# Altium PCB DRIVER.PcbDoc (part 5 of 5)
Units mm, origin at the board's own origin, x right, y up, seen from the top; angles counter-clockwise.
Board outline 130 x 51 mm, 4 copper layers (SIG, GND_SIG, PWR, GND_PWR), stack 1.544 mm thick; 199 components, 147 nets, 682 pads, 359 vias.
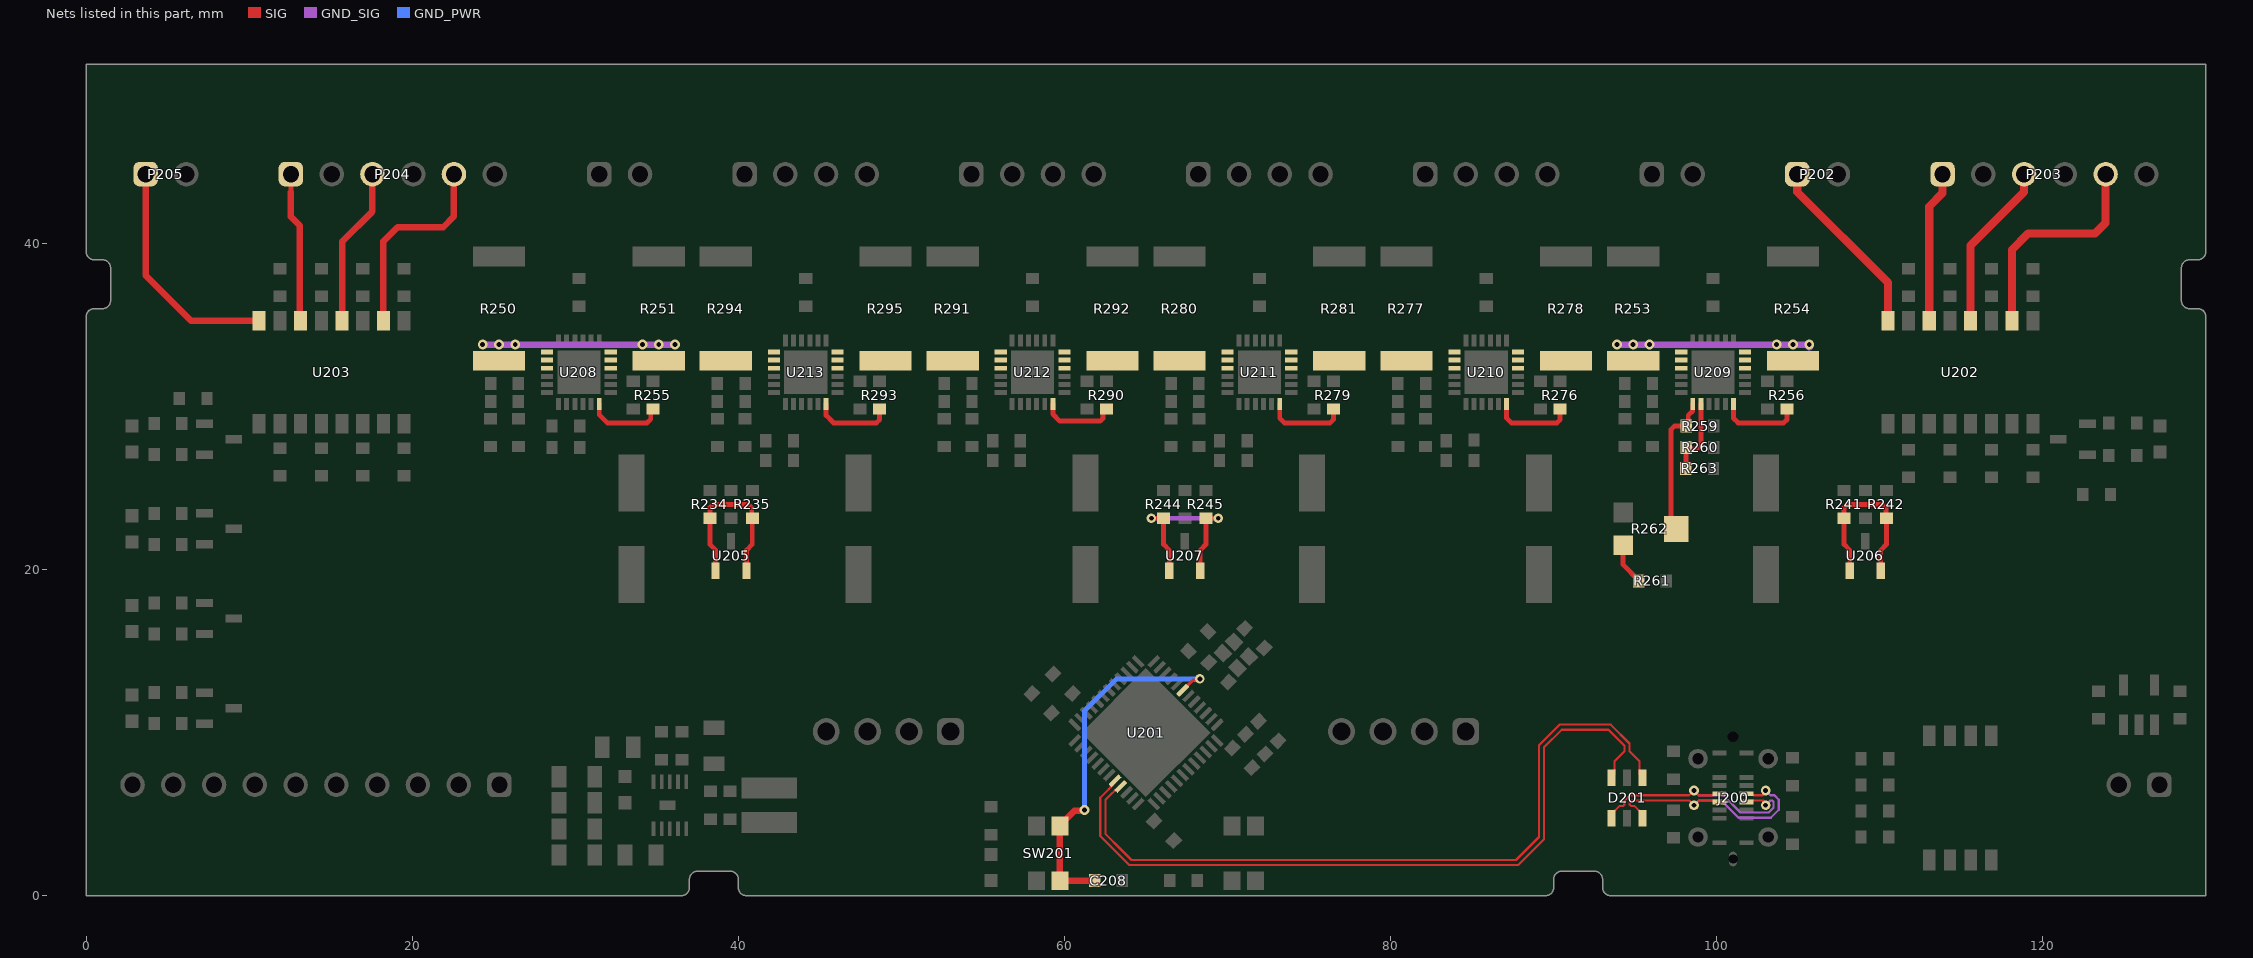
[diagram p5: the nets of this part, all layers, seen from the top]

## Via types
v1: diameter 0.6, hole 0.3, SIG to GND_PWR, tented both sides, 324 vias
v2: diameter 0.6, hole 0.3, SIG to GND_PWR, 35 vias

## Nets (pads, with @x,y where several pads share a name; then routed paths per layer and width w, separated by ;. In a path a pad name is that pad's centre, name@x,y a point inside that pad or via, vN(x,y) a via of type N, cw(c..) or ccw(c..) an arc to the next point about the centre after c; other vN are vias at no path point) (continued)
NetR234_1: R234.1 R235.1 U205.1 U205.2 | length 10.8
  SIG w0.3: U205.1@38.606,19.935 38.606,21.194 38.256,21.544 R234.1@38.256,23.15 38.256,23.8 38.456,24 40.6,24 40.826,23.774 40.826,23.18 R235.1@40.856,23.15 40.856,21.544 40.506,21.194 U205.2@40.506,19.935
NetR241_1: R241.1 R242.1 U206.1 U206.2 | length 10.8
  SIG w0.3: U206.1@108.161,19.935 108.161,21.194 107.811,21.544 R241.1@107.811,23.15 107.811,23.8 108.011,24 110.155,24 110.381,23.774 110.381,23.18 R242.1@110.411,23.15 110.411,21.544 110.061,21.194 U206.2@110.061,19.935
NetR244_1: R244.1 R245.1 U207.1 U207.2 | length 12.3
  SIG w0.3: v1(65.328,23.15) R244.1@66.078,23.15 66.078,21.544 66.428,21.194 U207.1@66.428,19.935 ; U207.2@68.328,19.935 68.328,21.194 68.678,21.544 R245.1@68.678,23.15 v1(69.428,23.15)
  GND_SIG w0.3: v1(65.328,23.15) v1(69.428,23.15)
NetR250_2: R250.2 R251.2 U208.4 U208.5 U208.6 U208.13 U208.14 U208.15 | length 11.8
  GND_SIG w0.4: v1(24.322,33.8) v1(36.122,33.8)
  other v1: 25.322,33.8 26.322,33.8 34.122,33.8 35.122,33.8
NetR253_2: R253.2 R254.2 U209.4 U209.5 U209.6 U209.13 U209.14 U209.15 | length 11.8
  GND_SIG w0.4: v1(93.877,33.8) v1(105.677,33.8)
  GND_SIG w0.5: v1@105.667,33.71 v1@105.677,33.7
  other v1: 94.877,33.8 95.877,33.8 103.677,33.8 104.677,33.8
NetR255_2: R255.2 U208.24 | length 4.8
  SIG w0.3: U208.24@31.472,30.15 31.472,29.491 31.963,29 34.4,29 34.626,29.226 34.626,29.72 R255.2@34.756,29.85
NetR256_2: R256.2 U209.24 | length 5
  SIG w0.3: U209.24@101.027,30.15 101.027,29.284 101.311,29 104.111,29 104.311,29.2 R256.2@104.311,29.85
NetR261_2: R261.2 R262.3 | length 2.6
  SIG w0.3: R262.3@94.256,21.5 94.256,20.3 95.206,19.35 R261.2@95.206,19.3
NetR276_2: R276.2 U210.24 | length 5
  SIG w0.3: U210.24@87.116,30.15 87.116,29.284 87.4,29 90.2,29 90.4,29.2 R276.2@90.4,29.85
NetR277_2: R277.2 U210.13 U210.14 U210.15
NetR278_2: R278.2 U210.4 U210.5 U210.6
NetR279_2: R279.2 U211.24 | length 5
  SIG w0.3: U211.24@73.205,30.15 73.205,29.284 73.489,29 76.289,29 76.489,29.2 R279.2@76.489,29.85
NetR280_2: R280.2 U211.13 U211.14 U211.15
NetR281_2: R281.2 U211.4 U211.5 U211.6
NetR290_2: R290.2 U212.24 | length 4.6
  SIG w0.3: U212.24@59.294,30.15 59.294,29.525 59.719,29.1 62.19,29.1 62.366,29.276 62.366,29.65 62.566,29.85 R290.2@62.578,29.85
NetR291_2: R291.2 U212.13 U212.14 U212.15
NetR292_2: R292.2 U212.4 U212.5 U212.6
NetR293_2: R293.2 U213.24 | length 4.9
  SIG w0.3: U213.24@45.383,30.15 45.383,29.455 45.838,29 48.467,29 48.667,29.2 R293.2@48.667,29.85
NetR294_2: R294.2 U213.13 U213.14 U213.15
NetR295_2: R295.2 U213.4 U213.5 U213.6
NRST: C208.2 SW201.2 SW201.4 U201.7 | length 22.7
  SIG w0.2: U201.7@67.249,12.602 67.258,12.602 67.879,13.223 68.223,13.223 v1(68.3,13.3)
  SIG w0.4: v1(61.225,5.25) 61.187,5.212 60.612,5.212 59.725,4.325 SW201.4@59.725,4.275 SW201.2@59.725,0.925 C208.2@61.85,0.925
  GND_PWR w0.3: v1(61.225,5.25) 61.225,11.325 63.2,13.3 v1(68.3,13.3)
OPT_DOOR: P202.1 U202.8 | length 11.3
  SIG w0.5: P202.1@104.938,44.25 104.938,43.15 110.493,37.595 U202.8@110.493,35.25
OPT_HOLD: P203.3 U202.4 | length 10.4
  SIG w0.5: U202.4@115.573,35.25 115.573,39.874 118.849,43.15 P203.3@118.849,44.25
OPT_LIM_X: P204.1 U203.6 | length 9.6
  SIG w0.3: 12.561,42.8 P204.1@12.561,44.25
  SIG w0.4: 12.561,43.15 12.561,42.8 12.561,41.639 13.1,41.1 13.1,35.307 U203.6@13.157,35.25
OPT_LIM_Y: P204.3 U203.4 | length 9.8
  SIG w0.4: U203.4@15.697,35.25 15.697,40.097 17.561,41.961 P204.3@17.561,44.25
OPT_LIM_Z: P204.5 U203.2 | length 12.4
  SIG w0.4: U203.2@18.237,35.25 18.237,40.137 19.1,41 21.9,41 22.561,41.661 P204.5@22.561,44.25
OPT_PROBE: P205.1 U203.8 | length 14.3
  SIG w0.4: P205.1@3.65,44.25 3.65,38.05 6.45,35.25 U203.8@10.617,35.25
OPT_SOFT_R: P203.5 U202.2 | length 13.8
  SIG w0.5: U202.2@118.113,35.25 118.113,39.613 119.1,40.6 123.2,40.6 123.849,41.249 P203.5@123.849,44.25
OPT_START: P203.1 U202.6 | length 9.3
  SIG w0.5: U202.6@113.033,35.25 113.033,42.266 113.849,43.082 P203.1@113.849,44.25
USBCON_N: D201.1 J200.A7 J200.B7 | length 15.8
  SIG w0.136: D201.1@93.55,4.755 93.55,5.009 94.05,5.509 94.264,5.509 94.343,5.588 94.343,5.831 94.672,6.159 97.982,6.159 97.984,6.157 98.307,6.157 v1(98.6,6.45) 98.893,6.157 99.733,6.157 99.744,6.168 100.088,6.168 J200.B7@100.17,6.25 ; J200.A7@101.83,5.75 101.912,5.832 102.256,5.832 102.267,5.843 102.593,5.843 102.835,5.843 102.949,5.729 102.949,5.601 v1(103,5.55)
  GND_SIG w0.136: v1(98.6,6.45) 98.893,6.157 100.402,6.157 101.462,5.097 103.188,5.097 103.487,5.396 103.487,5.764 103.408,5.843 103.293,5.843 v1(103,5.55)
USBCON_P: D201.3 J200.A6 J200.B6 | length 16.3
  SIG w0.136: D201.3@95.45,4.755 95.45,5.009 94.95,5.509 94.736,5.509 94.657,5.588 94.657,5.701 94.801,5.846 97.852,5.846 97.854,5.843 98.307,5.843 v1(98.6,5.55) 98.893,5.843 99.733,5.843 99.744,5.832 100.088,5.832 J200.B6@100.17,5.75 ; J200.A6@101.83,6.25 101.912,6.168 102.256,6.168 102.267,6.157 102.723,6.157 102.835,6.157 102.949,6.271 102.949,6.399 v1(103,6.45)
  GND_SIG w0.136: v1(98.6,5.55) 98.893,5.843 100.272,5.843 101.332,4.783 103.318,4.783 103.801,5.266 103.801,5.894 103.537,6.157 103.293,6.157 v1(103,6.45)
USBMIC_N: D201.6 U201.32 | length 46.1
  SIG w0.136: U201.32@63.105,7.044 63.105,6.949 62.855,6.699 62.855,6.663 62.719,6.527 62.195,6.003 62.195,3.662 63.178,2.678 63.978,1.878 87.822,1.878 89.413,3.47 89.413,9.1 90.492,10.178 93.365,10.178 94.343,9.2 94.343,8.86 93.736,8.253 93.736,7.431 D201.6@93.55,7.245
USBMIC_P: D201.4 U201.33 | length 45.8
  SIG w0.136: U201.33@63.459,6.691 63.363,6.691 63.114,6.441 63.077,6.441 62.849,6.213 62.509,5.873 62.509,3.791 63.492,2.808 64.108,2.192 87.692,2.192 89.1,3.6 89.1,9.23 90.362,10.492 93.495,10.492 94.657,9.33 94.657,8.86 95.264,8.253 95.264,7.431 D201.4@95.45,7.245
VAC_DIR: R260.2 R263.2 U209.20 | length 4.9
  SIG w0.3: R263.2@98.1,26.2 98.113,26.214 98.113,27.487 R260.2@98.127,27.5 98.227,27.4 98.8,27.4 99.027,27.627 U209.20@99.027,30.15
VAC_SPEED: R259.2 R262.2 U209.19 | length 8.8
  SIG w0.3: R262.2@97.505,22.5 97.2,22.805 97.2,28.6 97.4,28.8 R259.2@98.127,28.8 98.257,28.93 98.257,29.457 98.527,29.727 U209.19@98.527,30.15
pads on no net: J200.A8 J200.B8 J200.MH1 J200.MH2 U200.6 U201.2 U201.4 U201.16 U201.17 U201.21 U201.38 U201.39 U201.40 U201.41 U204.4

## Polygon pours and split planes (outlines as drawn)
NetP210_4 on SIG "NETP210_4_L01_P347" (solid, pour order 347): 86.966,34.425 87.424,34.425 87.599,34.6 87.599,36 87.799,36.2 88.499,36.2 88.699,36 88.699,33.9 88.477,33.678 86.966,33.678
NetP210_1 on SIG "NETP210_1_L01_P345" (solid, pour order 345): 84.766,34.425 84.308,34.425 84.133,34.6 84.133,36 83.933,36.2 83.233,36.2 83.033,36 83.033,33.9 83.255,33.678 84.766,33.678
NetP211_4 on SIG "NETP211_4_L01_P343" (solid, pour order 343): 73.055,34.425 73.513,34.425 73.688,34.6 73.688,36 73.888,36.2 74.588,36.2 74.788,36 74.788,33.9 74.566,33.678 73.055,33.678
NetP211_1 on SIG "NETP211_1_L01_P341" (solid, pour order 341): 70.855,34.425 70.397,34.425 70.222,34.6 70.222,36 70.022,36.2 69.322,36.2 69.122,36 69.122,33.9 69.344,33.678 70.855,33.678
NetP212_4 on SIG "NETP212_4_L01_P339" (solid, pour order 339): 59.144,34.425 59.602,34.425 59.777,34.6 59.777,36 59.977,36.2 60.677,36.2 60.877,36 60.877,33.9 60.655,33.678 59.144,33.678
NetP212_1 on SIG "NETP212_1_L01_P337" (solid, pour order 337): 56.944,34.425 56.486,34.425 56.311,34.6 56.311,36 56.111,36.2 55.411,36.2 55.211,36 55.211,33.9 55.433,33.678 56.944,33.678
NetP208_2 on SIG "NONET_L-01_P-001" (solid, pour order 352): 100.677,33.675 100.377,33.675 100.377,35.992 100.585,36.2 101.11,36.2 101.31,36 101.31,34.9 101.11,34.7 100.824,34.7 100.677,34.553
NetP208_1 on SIG "NETP208_1_L01_P351" (solid, pour order 351): 100.877,34.425 101.335,34.425 101.51,34.6 101.51,36 101.71,36.2 102.41,36.2 102.61,36 102.61,33.9 102.388,33.678 100.877,33.678
NetP208_2 on SIG "NONET_L-01_P-001" (solid, pour order 350): 98.877,33.675 99.177,33.675 99.177,35.992 98.969,36.2 98.444,36.2 98.244,36 98.244,34.9 98.444,34.7 98.73,34.7 98.877,34.553
NetP208_1 on SIG "NETP208_1_L01_P349" (solid, pour order 349): 98.677,34.425 98.219,34.425 98.044,34.6 98.044,36 97.844,36.2 97.144,36.2 96.944,36 96.944,33.9 97.166,33.678 98.677,33.678
NetP210_3 on SIG "NONET_L-01_P-001" (solid, pour order 348): 86.766,33.675 86.466,33.675 86.466,35.992 86.674,36.2 87.199,36.2 87.399,36 87.399,34.9 87.199,34.7 86.913,34.7 86.766,34.553
NetP210_2 on SIG "NONET_L-01_P-001" (solid, pour order 346): 84.966,33.675 85.266,33.675 85.266,35.992 85.058,36.2 84.533,36.2 84.333,36 84.333,34.9 84.533,34.7 84.819,34.7 84.966,34.553
NetP211_3 on SIG "NONET_L-01_P-001" (solid, pour order 344): 72.855,33.675 72.555,33.675 72.555,35.992 72.763,36.2 73.288,36.2 73.488,36 73.488,34.9 73.288,34.7 73.002,34.7 72.855,34.553
NetP211_2 on SIG "NONET_L-01_P-001" (solid, pour order 342): 71.055,33.675 71.355,33.675 71.355,35.992 71.147,36.2 70.622,36.2 70.422,36 70.422,34.9 70.622,34.7 70.908,34.7 71.055,34.553
NetP212_3 on SIG "NONET_L-01_P-001" (solid, pour order 340): 58.944,33.675 58.644,33.675 58.644,35.992 58.852,36.2 59.377,36.2 59.577,36 59.577,34.9 59.377,34.7 59.091,34.7 58.944,34.553
NetP212_2 on SIG "NONET_L-01_P-001" (solid, pour order 338): 57.144,33.675 57.444,33.675 57.444,35.992 57.236,36.2 56.711,36.2 56.511,36 56.511,34.9 56.711,34.7 56.997,34.7 57.144,34.553
NetP207_2 on SIG "NONET_L-01_P-001" (solid, pour order 336): 31.122,33.675 30.822,33.675 30.822,35.992 31.03,36.2 31.555,36.2 31.755,36 31.755,34.9 31.555,34.7 31.269,34.7 31.122,34.553
NetP207_1 on SIG "NETP207_1_L01_P335" (solid, pour order 335): 31.322,34.425 31.78,34.425 31.955,34.6 31.955,36 32.155,36.2 32.855,36.2 33.055,36 33.055,33.9 32.833,33.678 31.322,33.678
NetP207_2 on SIG "NONET_L-01_P-001" (solid, pour order 334): 29.322,33.675 29.622,33.675 29.622,35.992 29.414,36.2 28.889,36.2 28.689,36 28.689,34.9 28.889,34.7 29.175,34.7 29.322,34.553
NetP207_1 on SIG "NETP207_1_L01_P333" (solid, pour order 333): 29.122,34.425 28.664,34.425 28.489,34.6 28.489,36 28.289,36.2 27.589,36.2 27.389,36 27.389,33.9 27.611,33.678 29.122,33.678
+24V_PSU on SIG "NONET_L-01_P-001" (solid, pour order 328): 32.3,23.8 32.6,23.5 34.3,23.5 34.6,23.8 34.6,28.289 34.289,28.6 32.589,28.6 32.3,28.311
+24V_PSU on SIG "NONET_L-01_P-001" (solid, pour order 332): 101.855,23.8 102.155,23.5 103.855,23.5 104.155,23.8 104.155,28.289 103.844,28.6 102.144,28.6 101.855,28.311
+24V_PSU on SIG "NONET_L-01_P-001" (solid, pour order 331): 87.944,23.8 88.244,23.5 89.944,23.5 90.244,23.8 90.244,28.289 89.933,28.6 88.233,28.6 87.944,28.311
+24V_PSU on SIG "NONET_L-01_P-001" (solid, pour order 330): 74.033,23.8 74.333,23.5 76.033,23.5 76.333,23.8 76.333,28.289 76.022,28.6 74.322,28.6 74.033,28.311
+24V_PSU on SIG "NONET_L-01_P-001" (solid, pour order 329): 60.122,23.8 60.422,23.5 62.122,23.5 62.422,23.8 62.422,28.289 62.111,28.6 60.411,28.6 60.122,28.311
NetP213_4 on SIG "NETP213_4_L01_P316" (solid, pour order 316): 45.233,34.425 45.691,34.425 45.866,34.6 45.866,36 46.066,36.2 46.766,36.2 46.966,36 46.966,33.9 46.744,33.678 45.233,33.678
NetP213_3 on SIG "NONET_L-01_P-001" (solid, pour order 317): 45.033,33.675 44.733,33.675 44.733,35.992 44.941,36.2 45.466,36.2 45.666,36 45.666,34.9 45.466,34.7 45.18,34.7 45.033,34.553
NetP213_2 on SIG "NONET_L-01_P-001" (solid, pour order 278): 43.233,33.675 43.533,33.675 43.533,35.992 43.325,36.2 42.8,36.2 42.6,36 42.6,34.9 42.8,34.7 43.086,34.7 43.233,34.553
NetP213_1 on SIG "NETP213_1_L01_P277" (solid, pour order 277): 43.033,34.425 42.575,34.425 42.4,34.6 42.4,36 42.2,36.2 41.5,36.2 41.3,36 41.3,33.9 41.522,33.678 43.033,33.678
GND on SIG "NONET_L-01_P-001" (solid, pour order 310): 101.855,18.2 102.155,17.9 103.855,17.9 104.155,18.2 104.155,21.8 103.855,22.1 102.155,22.1 101.855,21.8
GND on SIG "NONET_L-01_P-001" (solid, pour order 308): 87.944,18.2 88.244,17.9 89.944,17.9 90.244,18.2 90.244,21.8 89.944,22.1 88.244,22.1 87.944,21.8
GND on SIG "NONET_L-01_P-001" (solid, pour order 306): 74.033,18.2 74.333,17.9 76.033,17.9 76.333,18.2 76.333,21.8 76.033,22.1 74.333,22.1 74.033,21.8
GND on SIG "NONET_L-01_P-001" (solid, pour order 304): 60.122,18.2 60.422,17.9 62.122,17.9 62.422,18.2 62.422,21.8 62.122,22.1 60.422,22.1 60.122,21.8
+24V_PSU on SIG "NONET_L-01_P-001" (solid, pour order 303): 46.211,23.8 46.511,23.5 48.211,23.5 48.511,23.8 48.511,28.289 48.2,28.6 46.5,28.6 46.211,28.311
GND on SIG "NONET_L-01_P-001" (solid, pour order 302): 46.211,18.2 46.511,17.9 48.211,17.9 48.511,18.2 48.511,21.8 48.211,22.1 46.511,22.1 46.211,21.8
+24V_PSU on SIG "+24V_PSU_L01_P296" (solid, pour order 296): 99.377,33.675 100.177,33.675 100.177,36.5 99.377,36.5
+24V_PSU on SIG "+24V_PSU_L01_P291" (solid, pour order 291): 85.466,33.675 86.266,33.675 86.266,36.5 85.466,36.5
+24V_PSU on SIG "+24V_PSU_L01_P286" (solid, pour order 286): 71.555,33.675 72.355,33.675 72.355,36.5 71.555,36.5
+24V_PSU on SIG "+24V_PSU_L01_P281" (solid, pour order 281): 57.644,33.675 58.444,33.675 58.444,36.5 57.644,36.5
+24V_PSU on SIG "+24V_PSU_L01_P276" (solid, pour order 276): 43.733,33.675 44.533,33.675 44.533,36.5 43.733,36.5
+VDD_MCU on SIG "NONET_L-01_P-001" (solid, pour order 240): 37.7,11 37.7,9.9 37.9,9.7 39.2,9.7 40.7,8.2 43.4,8.2 43.6,8.4 43.6,11 43.4,11.2 37.9,11.2
NetR253_2 on SIG "NONET_L-01_P-001" (solid, pour order 249): 96.477,32.801 93.06,32.801 93.011,32.85 93.011,34.1 93.211,34.3 96.341,34.3 96.536,34.104 96.536,33.786 97.022,33.3 97.022,32.8
NetR253_2 on SIG "NONET_L-01_P-001" (solid, pour order 248): 103.077,32.801 106.494,32.801 106.543,32.85 106.543,34.1 106.343,34.3 103.213,34.3 103.018,34.104 103.018,33.786 102.532,33.3 102.532,32.8
NetR250_2 on SIG "NONET_L-01_P-001" (solid, pour order 247): 33.522,32.801 36.939,32.801 36.988,32.85 36.988,34.1 36.788,34.3 33.658,34.3 33.463,34.104 33.463,33.786 32.977,33.3 32.977,32.8
NetR250_2 on SIG "NONET_L-01_P-001" (solid, pour order 246): 26.922,32.801 23.505,32.801 23.456,32.85 23.456,34.1 23.656,34.3 26.786,34.3 26.981,34.104 26.981,33.786 27.467,33.3 27.467,32.8
GND on SIG "NONET_L-01_P-001" (solid, pour order 233): 32.3,6.1 32.3,4.1 32.6,3.8 32.6,1.8 33.5,1.8 33.5,3.8 33.8,4.1 33.8,6.1
GND on SIG "NONET_L-01_P-001" (solid, pour order 237): 31.1,8.5 31.3,8.3 32,8.3 32.2,8.5 32.2,9.7 32.5,10 34.5,10 34.8,9.7 37,9.7 37.2,9.9 37.2,10.6 37,10.8 31.3,10.8 31.1,10.6
+3V3 on SIG "NONET_L-01_P-001" (solid, pour order 236): 36.15,8.7 36.145,8.695 36.145,6.555 36.652,6.048 39.852,6.048 40.1,5.8 43.6,5.8 43.6,7.5 40.2,7.5 39,8.7
+24V_PSU on SIG "NONET_L-01_P-001" (solid, pour order 232): 29.5,2 30.1,1.4 34.2,1.4 34.5,1.7 34.5,3.2 34.7,3.4 35,3.4 35.186,3.586 35.186,4.6 35.914,4.6 35.914,1.014 35.4,0.5 26.9,0.5 26.9,2
NetL200_1 on SIG "NONET_L-01_P-001" (solid, pour order 234): 36.186,4.6 36.186,2.814 36.9,2.1 43.1,2.1 43.6,2.6 43.6,5.148 40.2,5.148 40.2,3.4 39.8,3 36.8,3 36.414,3.386 36.414,4.6
GND on SIG "NONET_L-01_P-001" (solid, pour order 235): 35.155,5.243 36.357,5.243 36.686,4.914 36.686,3.514 36.9,3.3 39.7,3.3 39.9,3.5 39.9,5.1 39.7,5.3 37.467,5.3 36.914,5.853 35.155,5.853
+24V_PSU on SIG "NONET_L-01_P-001" (solid, pour order 231): 14.3,7.5 14.8,8 26,8 29.5,8 29.8,7.7 29.8,1 29.3,0.5 14.8,0.5 14.3,1
+VREF_STPR on SIG "+VREF_STPR_L01_P222" (solid, pour order 222): 59.619,31 60.378,31 60.478,30.9 60.478,30.611 60.589,30.5 61.789,30.5 61.878,30.411 61.878,29.6 61.778,29.5 59.778,29.5 59.619,29.659 59.619,30.997
+VREF_STPR on SIG "+VREF_STPR_L01_P225" (solid, pour order 225): 45.708,31 46.467,31 46.567,30.9 46.567,30.611 46.678,30.5 47.878,30.5 47.967,30.411 47.967,29.6 47.867,29.5 45.867,29.5 45.708,29.659 45.708,30.997
+VREF_SP on SIG "+VREF_SP_L01_P226" (solid, pour order 226): 31.797,31.5 32.545,31.5 32.656,31.389 32.656,30.7 32.856,30.5 33.945,30.5 34.056,30.389 34.056,29.6 33.956,29.5 31.956,29.5 31.797,29.659 31.797,30.997
+VREF_VAC on SIG "+VREF_VAC_L01_P127" (solid, pour order 127): 101.352,31.5 102.1,31.5 102.211,31.389 102.211,30.7 102.411,30.5 103.5,30.5 103.611,30.389 103.611,29.6 103.511,29.5 101.511,29.5 101.352,29.659 101.352,30.997
+VREF_STPR on SIG "+VREF_STPR_L01_P223" (solid, pour order 223): 87.441,31 88.2,31 88.3,30.9 88.3,30.611 88.411,30.5 89.611,30.5 89.7,30.411 89.7,29.6 89.6,29.5 87.6,29.5 87.441,29.659 87.441,30.997
+VREF_STPR on SIG "+VREF_STPR_L01_P074" (solid, pour order 74): 73.53,31 74.289,31 74.389,30.9 74.389,30.611 74.5,30.5 75.7,30.5 75.789,30.411 75.789,29.6 75.689,29.5 73.689,29.5 73.53,29.659 73.53,30.997
GND on SIG "GND_L01_P019" (solid, pour order 19): 81.7,28.4 81.7,26.3 81.8,26.2 83.7,26.2 83.8,26.3 83.8,28.4 83.7,28.5 81.8,28.5
GND on SIG "GND_L01_P075" (solid, pour order 75): 67.789,28.4 67.789,26.3 67.889,26.2 69.789,26.2 69.889,26.3 69.889,28.4 69.789,28.5 67.889,28.5
GND on SIG "GND_L01_P087" (solid, pour order 87): 53.878,28.4 53.878,26.3 53.978,26.2 55.878,26.2 55.978,26.3 55.978,28.4 55.878,28.5 53.978,28.5
GND on SIG "GND_L01_P099" (solid, pour order 99): 39.967,28.4 39.967,26.3 40.067,26.2 41.967,26.2 42.067,26.3 42.067,28.4 41.967,28.5 40.067,28.5
GND on SIG "GND_L01_P129" (solid, pour order 129): 17 vertices, not listed, extent 93.011,37.3 106.511,41.8
GND on SIG "NONET_L-01_P-001" (solid, pour order 174): 32.3,18.2 32.6,17.9 34.3,17.9 34.6,18.2 34.6,21.8 34.3,22.1 32.6,22.1 32.3,21.8
GND on SIG "NONET_L-01_P-001" (solid, pour order 155): 30.845,31.7 32.945,31.7 33.045,31.6 33.045,31.2 33.145,31.1 35.245,31.1 35.345,31.2 35.345,31.9 35.245,32 30.845,32
GND on SIG "NONET_L-01_P-001" (solid, pour order 154): 29.822,31.1 29.822,29.623 29.922,29.523 29.922,27.023 30.045,26.9 30.445,26.9 30.622,27.077 30.622,29.523 30.622,31.1
NetR250_2 on SIG "NETR250_2_L01_P151" (solid, pour order 151): 31.763,33.5 36.838,33.5 36.963,33.375 36.963,32.325 36.838,32.2 33.463,32.2 31.763,32.2
NetR250_2 on SIG "NETR250_2_L01_P150" (solid, pour order 150): 28.681,32.2 23.656,32.2 23.456,32.4 23.456,33.3 23.656,33.5 26.981,33.5 28.681,33.5
+24V_PSU on SIG "+24V_PSU_L01_P145" (solid, pour order 145): 29.822,33.675 30.622,33.675 30.622,36.5 29.822,36.5
+24V_PSU on SIG "+24V_PSU_L01_P144" (solid, pour order 144): 29.822,33.675 30.622,33.675 30.622,36.5 29.822,36.5
GND on SIG "GND_L01_P143" (solid, pour order 143): 17 vertices, not listed, extent 23.456,37.3 36.956,41.8
GND on SIG "NONET_L-01_P-001" (solid, pour order 128): 99.377,31.1 99.377,29.623 99.477,29.523 99.477,27.023 99.6,26.9 100,26.9 100.177,27.077 100.177,29.523 100.177,31.1
GND on SIG "NONET_L-01_P-001" (solid, pour order 126): 100.4,31.7 102.5,31.7 102.6,31.6 102.6,31.2 102.7,31.1 104.8,31.1 104.9,31.2 104.9,31.9 104.8,32 100.4,32
NetR253_2 on SIG "NETR253_2_L01_P122" (solid, pour order 122): 98.236,32.2 93.211,32.2 93.011,32.4 93.011,33.3 93.211,33.5 96.536,33.5 98.236,33.5
NetR253_2 on SIG "NETR253_2_L01_P121" (solid, pour order 121): 101.318,33.5 106.393,33.5 106.518,33.375 106.518,32.325 106.393,32.2 103.018,32.2 101.318,32.2
GND on SIG "NONET_L-01_P-001" (solid, pour order 120): 44.978,32 49.178,32 49.278,31.9 49.278,31.3 49.178,31.2 44.978,31.2
GND on SIG "NONET_L-01_P-001" (solid, pour order 119): 58.889,32 63.089,32 63.189,31.9 63.189,31.3 63.089,31.2 58.889,31.2
GND on SIG "NONET_L-01_P-001" (solid, pour order 118): 86.711,32 90.911,32 91.011,31.9 91.011,31.3 90.911,31.2 86.711,31.2
GND on SIG "NONET_L-01_P-001" (solid, pour order 117): 72.8,32 77,32 77.1,31.9 77.1,31.3 77,31.2 72.8,31.2
GND on SIG "GND_L01_P092" (solid, pour order 92): 17 vertices, not listed, extent 37.367,37.3 50.867,41.8
NetR295_2 on SIG "NETR295_2_L01_P091" (solid, pour order 91): 45.674,33.5 50.749,33.5 50.874,33.375 50.874,32.325 50.749,32.2 47.374,32.2 45.674,32.2
NetR294_2 on SIG "NETR294_2_L01_P090" (solid, pour order 90): 42.592,32.2 37.567,32.2 37.367,32.4 37.367,33.3 37.567,33.5 40.892,33.5 42.592,33.5
GND on SIG "GND_L01_P080" (solid, pour order 80): 17 vertices, not listed, extent 51.278,37.3 64.778,41.8
NetR292_2 on SIG "NETR292_2_L01_P079" (solid, pour order 79): 59.585,33.5 64.66,33.5 64.785,33.375 64.785,32.325 64.66,32.2 61.285,32.2 59.585,32.2
NetR291_2 on SIG "NETR291_2_L01_P078" (solid, pour order 78): 56.503,32.2 51.478,32.2 51.278,32.4 51.278,33.3 51.478,33.5 54.803,33.5 56.503,33.5
GND on SIG "GND_L01_P068" (solid, pour order 68): 17 vertices, not listed, extent 65.189,37.3 78.689,41.8
NetR281_2 on SIG "NETR281_2_L01_P067" (solid, pour order 67): 73.496,33.5 78.571,33.5 78.696,33.375 78.696,32.325 78.571,32.2 75.196,32.2 73.496,32.2
NetR280_2 on SIG "NETR280_2_L01_P066" (solid, pour order 66): 70.414,32.2 65.389,32.2 65.189,32.4 65.189,33.3 65.389,33.5 68.714,33.5 70.414,33.5
GND on SIG "GND_L01_P002" (solid, pour order 2): 17 vertices, not listed, extent 79.1,37.3 92.6,41.8
NetR278_2 on SIG "NETR278_2_L01_P001" (solid, pour order 1): 87.407,33.5 92.482,33.5 92.607,33.375 92.607,32.325 92.482,32.2 89.107,32.2 87.407,32.2
NetR277_2 on SIG "NETR277_2_L01_P000" (solid, pour order 0): 84.325,32.2 79.3,32.2 79.1,32.4 79.1,33.3 79.3,33.5 82.625,33.5 84.325,33.5
+VDD_MCU on PWR "PWR-+VDD_MCU" (solid, pour order 383): 35 vertices, not listed, extent 38.5,0.5 106,16.5
+3V3 on PWR "PWR-+3V3" (solid, pour order 381): 42 vertices, not listed, extent 0.5,0.5 122.5,29.5
+24V_PSU on PWR "NONET_L-01_P-001" (solid, pour order 375): 25 vertices, not listed, extent 99.244,26.3 104.444,36.1
+24V_PSU on PWR "NONET_L-01_P-001" (solid, pour order 376): 25 vertices, not listed, extent 29.689,26.3 34.889,36.1
+24V_PSU on PWR "NONET_L-01_P-001" (solid, pour order 314): 18 vertices, not listed, extent 14.5,5 106,28
NetP207_1 on PWR "NONET_L-01_P-001" (solid, pour order 185): 17 vertices, not listed, extent 27.2,34.1 32.3,45.2
NetP213_4 on PWR "NETP213_4_L03_P324" (solid, pour order 324): 46.266,36.2 46.066,36 46.066,35 46.266,34.8 48.466,34.8 48.666,35 48.666,44.9 48.366,45.2 47.366,45.2 47.091,44.925 47.091,36.325 46.966,36.2
NetP212_4 on PWR "NETP212_4_L03_P355" (solid, pour order 355): 60.177,36.2 59.977,36 59.977,35 60.177,34.8 62.377,34.8 62.577,35 62.577,44.9 62.277,45.2 61.277,45.2 61.002,44.925 61.002,36.325 60.877,36.2
NetP212_1 on PWR "NETP212_1_L03_P353" (solid, pour order 353): 55.911,36.2 56.111,36 56.111,35 55.911,34.8 53.711,34.8 53.511,35 53.511,44.9 53.811,45.2 54.811,45.2 55.086,44.925 55.086,36.325 55.211,36.2
NetP211_4 on PWR "NETP211_4_L03_P360" (solid, pour order 360): 74.088,36.2 73.888,36 73.888,35 74.088,34.8 76.288,34.8 76.488,35 76.488,44.9 76.188,45.2 75.188,45.2 74.913,44.925 74.913,36.325 74.788,36.2
NetP211_1 on PWR "NETP211_1_L03_P358" (solid, pour order 358): 69.822,36.2 70.022,36 70.022,35 69.822,34.8 67.622,34.8 67.422,35 67.422,44.9 67.722,45.2 68.722,45.2 68.997,44.925 68.997,36.325 69.122,36.2
NetP210_4 on PWR "NETP210_4_L03_P365" (solid, pour order 365): 87.999,36.2 87.799,36 87.799,35 87.999,34.8 90.199,34.8 90.399,35 90.399,44.9 90.099,45.2 89.099,45.2 88.824,44.925 88.824,36.325 88.699,36.2
NetP210_1 on PWR "NETP210_1_L03_P363" (solid, pour order 363): 83.733,36.2 83.933,36 83.933,35 83.733,34.8 81.533,34.8 81.333,35 81.333,44.9 81.633,45.2 82.633,45.2 82.908,44.925 82.908,36.325 83.033,36.2
NetP208_1 on PWR "NETP208_1_L03_P373" (solid, pour order 373): 97.644,36.2 97.844,36 97.844,35 97.644,34.8 95.444,34.8 95.244,35 95.244,44.9 95.544,45.2 96.544,45.2 96.819,44.925 96.819,36.325 96.944,36.2
+24V_PSU on PWR "NONET_L-01_P-001" (solid, pour order 367): 25 vertices, not listed, extent 85.333,26.3 90.533,36.1
+24V_PSU on PWR "NONET_L-01_P-001" (solid, pour order 362): 25 vertices, not listed, extent 71.422,26.3 76.622,36.1
+24V_PSU on PWR "NONET_L-01_P-001" (solid, pour order 357): 25 vertices, not listed, extent 57.511,26.3 62.711,36.1
NetP207_2 on PWR "NONET_L-01_P-001" (solid, pour order 163): 17 vertices, not listed, extent 28.5,34.1 34.8,45.2
NetP208_2 on PWR "NETP208_2_L03_P374" (solid, pour order 374): 98.244,34.8 98.044,35 98.044,36.1 97.743,36.401 97.743,44.899 98.044,45.2 99.044,45.2 99.294,44.95 99.294,36.251 99.044,36.001 99.044,35 98.844,34.8
NetP210_3 on PWR "NETP210_3_L03_P366" (solid, pour order 366): 87.399,34.8 87.599,35 87.599,36.1 87.9,36.401 87.9,44.899 87.599,45.2 86.599,45.2 86.349,44.95 86.349,36.251 86.599,36.001 86.599,35 86.799,34.8
NetP210_2 on PWR "NETP210_2_L03_P364" (solid, pour order 364): 84.333,34.8 84.133,35 84.133,36.1 83.832,36.401 83.832,44.899 84.133,45.2 85.133,45.2 85.383,44.95 85.383,36.251 85.133,36.001 85.133,35 84.933,34.8
NetP211_3 on PWR "NETP211_3_L03_P361" (solid, pour order 361): 73.488,34.8 73.688,35 73.688,36.1 73.989,36.401 73.989,44.899 73.688,45.2 72.688,45.2 72.438,44.95 72.438,36.251 72.688,36.001 72.688,35 72.888,34.8
NetP211_2 on PWR "NETP211_2_L03_P359" (solid, pour order 359): 70.422,34.8 70.222,35 70.222,36.1 69.921,36.401 69.921,44.899 70.222,45.2 71.222,45.2 71.472,44.95 71.472,36.251 71.222,36.001 71.222,35 71.022,34.8
NetP212_3 on PWR "NETP212_3_L03_P356" (solid, pour order 356): 59.577,34.8 59.777,35 59.777,36.1 60.078,36.401 60.078,44.899 59.777,45.2 58.777,45.2 58.527,44.95 58.527,36.251 58.777,36.001 58.777,35 58.977,34.8
NetP212_2 on PWR "NETP212_2_L03_P354" (solid, pour order 354): 56.511,34.8 56.311,35 56.311,36.1 56.01,36.401 56.01,44.899 56.311,45.2 57.311,45.2 57.561,44.95 57.561,36.251 57.311,36.001 57.311,35 57.111,34.8
+24V_PSU on PWR "NONET_L-01_P-001" (solid, pour order 327): 25 vertices, not listed, extent 43.6,26.3 48.8,36.1
NetP213_3 on PWR "NETP213_3_L03_P325" (solid, pour order 325): 45.666,34.8 45.866,35 45.866,36.1 46.167,36.401 46.167,44.899 45.866,45.2 44.866,45.2 44.616,44.95 44.616,36.251 44.866,36.001 44.866,35 45.066,34.8
NetP213_2 on PWR "NETP213_2_L03_P161" (solid, pour order 161): 42.6,34.8 42.4,35 42.4,36.1 42.099,36.401 42.099,44.899 42.4,45.2 43.4,45.2 43.65,44.95 43.65,36.251 43.4,36.001 43.4,35 43.2,34.8
NetP213_1 on PWR "NETP213_1_L03_P116" (solid, pour order 116): 42,36.2 42.2,36 42.2,35 42,34.8 39.8,34.8 39.6,35 39.6,44.9 39.9,45.2 40.9,45.2 41.175,44.925 41.175,36.325 41.3,36.2
+VBUS on PWR "NONET_L-01_P-001" (solid, pour order 267): 105.5,0.5 106,1 106,10 105.5,10.5 94.5,10.5 94,10 94,6.5 94.5,6 97,6 97.5,5.5 97.5,1 98,0.5
+3V3_ISO on PWR "NONET_L-01_P-001" (solid, pour order 215): 29 vertices, not listed, extent 11,12.2 129.5,50.5
GND_ISO on GND_SIG "NONET_L-01_P-001" (solid, pour order 197): 29 vertices, not listed, extent 0.5,0.5 129.5,50.5
GND on GND_SIG "GND_SIG-GND" (solid, pour order 384): 35 vertices, not listed, extent 0.5,0.5 121,31.5
GND on GND_PWR "GND_PWR-GND" (solid, pour order 380): 48 vertices, not listed, extent 0.5,0.5 129.5,43

## Silkscreen, mask and mechanical layers (free items; w line width, h text height)
Top Overlay:
  text "PROBE" at 3.195,40.785 h1.4
  text "FIM DE CURSO" at 14.964,40.785 h1.4
  text "SPINDLE" at 30.59,40.785 h1.4
  text "EIXO Z" at 42.406,40.785 h1.4
  text "EIXO Y2" at 55.935,40.785 h1.4
  text "EIXO Y1" at 69.932,40.785 h1.4
  text "EIXO X" at 84.035,40.785 h1.4
  text "ASPIRADOR" at 94.111,40.785 h1.4
  text "PORTA" at 104.437,40.785 h1.4
  text "CONTROLES" at 117.278,40.785 h1.4
  text "PROBE" at 1.44,26.295 h1.4 r90
  text "PORTA" at 129.389,26.249 h1.4 r90
  text "LIM X" at 1.44,21.071 h1.4 r90
  text "LIM Y" at 1.44,15.611 h1.4 r90
  text "GND" at 45.605,11.8 h1.4 r90
  text "TX" at 48.145,11.8 h1.4 r90
  text "RX" at 50.685,11.8 h1.4 r90
  text "VDD" at 53.225,11.8 h1.4 r90
  text "GND" at 77.605,11.8 h1.4 r90
  text "SWCLK" at 80.145,11.8 h1.4 r90
  text "SWDIO" at 82.685,11.8 h1.4 r90
  text "VDD" at 85.225,11.8 h1.4 r90
  text "AUG/2026 - REV: 0.1" at 14.452,11.551 h1.4 r90
  text "LIM Z" at 1.44,10.175 h1.4 r90
  text "NRST" at 57.75,5.485 h1.4
  text "BOOT" at 69.506,5.485 h1.4
Bottom Solder:
  rectangle: 30,19.5 100,40.5
Board Outline:
  lines w0.2: 0,0 36.5,0 ccw(c36.5,0.5) 37,0.5 37,1 cw(c37.5,1) 37.5,1.5 39,1.5 39.5,1.5 cw(c39.5,1) 40,1 40,0.5 ccw(c40.5,0.5) 40.5,0 89.5,0 ccw(c89.5,0.5) 90,0.5 90,1 cw(c90.5,1) 90.5,1.5 92,1.5 92.5,1.5 cw(c92.5,1) 93,1 93,0.5 ccw(c93.5,0.5) 93.5,0 130,0 130,5 130,32 130,35.5 ccw(c129.5,35.5) 129.5,36 129,36 cw(c129,36.5) 128.5,36.5 128.5,38 128.5,38.5 cw(c129,38.5) 129,39 129.5,39 ccw(c129.5,39.5) 130,39.5 130,50 0,50 0,39.5 ccw(c0.5,39.5) 0.5,39 1,39 cw(c1,38.5) 1.5,38.5 1.5,37 1.5,36.5 cw(c1,36.5) 1,36 0.5,36 ccw(c0.5,35.5) 0,35.5 0,32 0,5 0,0
Info:
  drawing of 295 lines, arcs and shapes, not listed
  text "PCB Technical Specification /  / - Base Material: FR-4 / - Number of Layers: 4 / - Board Dimensions: 130 x 51 mm / - Surface Finish: HASL (With Lead) / - Outer Copper Weight: 1oz / - Inner Copper Weight: 1oz / - Specify Stackup: Yes, JLC041611-3313 / - Impedance Control: Yes / - Via Covering: Plugged (or tented, whatever is cheaper) / - Min via hole size/diameter: 0.3mm/0.6mm / - Solder Mask: Top and Bottom (Green) / - Silkscreen: Top only (White)" at 135,39.848 h2
  text "Layer" at 136.968,36.83 h1.52
  text "Name" at 147.38,36.83 h1.52
  text "Material" at 170.996,36.83 h1.52
  text "Thickness" at 192.834,36.83 h1.52
  text "Constant" at 209.34,36.83 h1.52
  text "Board Layer Stack" at 223.814,36.83 h1.52
  text "Top Overlay" at 147.38,33.782 h1.52
  text "Top Solder" at 147.38,30.734 h1.52
  text "Solder Resist" at 170.996,30.734 h1.52
  text "0.010mm" at 192.834,30.734 h1.52
  text "3.5" at 209.34,30.734 h1.52
  text "1" at 136.968,27.686 h1.52
  text "SIG" at 147.38,27.686 h1.52
  text "CF-004" at 170.996,27.686 h1.52
  text "0.035mm" at 192.834,27.686 h1.52
  text "Dielectric 2" at 147.38,24.638 h1.52
  text "PP-006" at 170.996,24.638 h1.52
  text "0.092mm" at 192.834,24.638 h1.52
  text "4.1" at 209.34,24.638 h1.52
  text "2" at 136.968,21.59 h1.52
  text "GND_SIG" at 147.38,21.59 h1.52
  text "CF-004" at 170.996,21.59 h1.52
  text "0.030mm" at 192.834,21.59 h1.52
  text "Dielectric 1" at 147.38,18.542 h1.52
  text "FR-4" at 170.996,18.542 h1.52
  text "1.230mm" at 192.834,18.542 h1.52
  text "4.8" at 209.34,18.542 h1.52
  text "3" at 136.968,15.494 h1.52
  text "PWR" at 147.38,15.494 h1.52
  text "CF-004" at 170.996,15.494 h1.52
  text "0.030mm" at 192.834,15.494 h1.52
  text "Dielectric 3" at 147.38,12.446 h1.52
  text "PP-006" at 170.996,12.446 h1.52
  text "0.092mm" at 192.834,12.446 h1.52
  text "4.1" at 209.34,12.446 h1.52
  text "4" at 136.968,9.398 h1.52
  text "GND_PWR" at 147.38,9.398 h1.52
  text "CF-004" at 170.996,9.398 h1.52
  text "0.035mm" at 192.834,9.398 h1.52
  text "Bottom Solder" at 147.38,6.35 h1.52
  text "Solder Resist" at 170.996,6.35 h1.52
  text "0.010mm" at 192.834,6.35 h1.52
  text "3.5" at 209.34,6.35 h1.52
  text "Bottom Overlay" at 147.38,3.302 h1.52
  text "Total board thickness:" at 136.968,0.254 h1.52
  text "1.564mm" at 192.834,0.254 h1.52

## Dimensions
0,0 to 0,51 on Info
130,50 to 0,50 on Info

## Text inside footprints (layer, text, board x,y; h text height)
C219: Top Overlay "+" at 35.749,26.267 h2 r90
C220: Top Overlay "+" at 105.304,26.267 h2 r90
C229: Top Overlay "+" at 91.393,26.267 h2 r90
C230: Top Overlay "+" at 77.482,26.267 h2 r90
C239: Top Overlay "+" at 63.571,26.267 h2 r90
C240: Top Overlay "+" at 49.66,26.267 h2 r90
SW202: Top Overlay "ON" at 117.643,4.4 h0.89 r180; Top Component Outline "ON" at 117.643,4.4 h0.89 r180